# EAGLE board QTP-NEUTRIK D-hole (EAGLE 7.4.0)
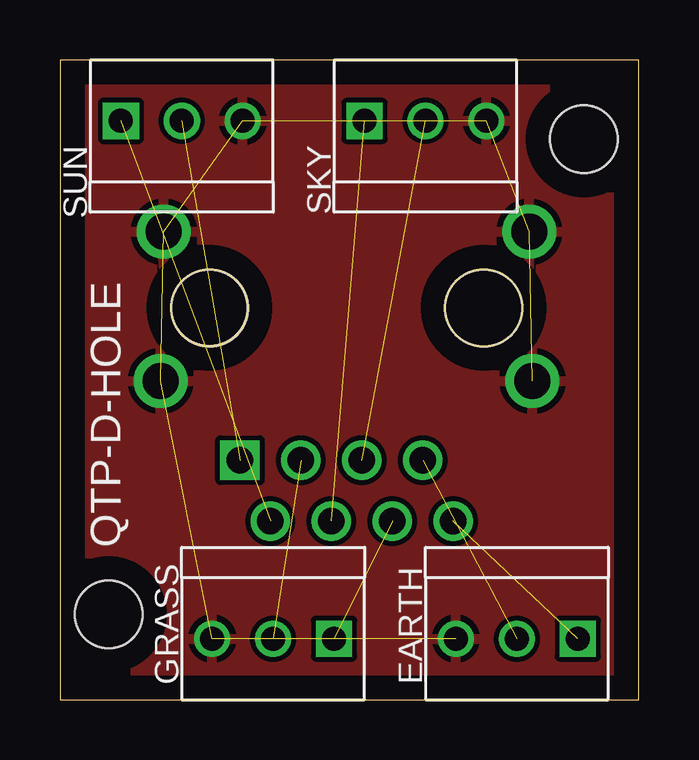
[diagram p0: board, top side]
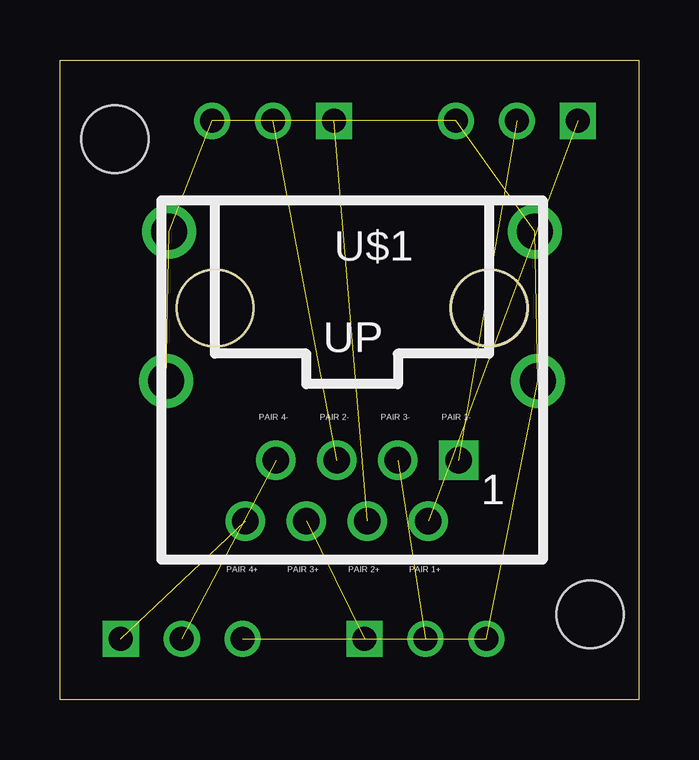
[diagram p1: board, bottom side, seen from below]

Size 24.13 x 26.67 mm. Coordinates in mm from the lower left corner, seen from the top.
Outline: 0,0 24.13,0 24.13,26.67 0,26.67 0,0
Copper layers (1*16): Top 0.035mm / dielectric 1.5mm / Bottom 0.035mm
Design rules "default": minimum track width 10mil, minimum drill 24mil, track to track 8mil, track to pad 8mil, pad to pad 8mil, via to via 8mil, smd to smd 8mil, copper to edge 40mil, drill to drill 8mil, minimum pad ring 10mil, minimum via ring 8mil, stop-mask expansion 4mil, vias tented up to drill 0mil, thermal gap 10mil
Holes 2.8 mm at 21.84,23.37 2.03,3.56
bRestrict: area 8.9,11.4 to 10.2,25.4

## Footprints (pad centres in the part's own frame; a part is rotated, then mirrored left to right if it is on the bottom)
CON-WBS-LOCKING-0.1-3 = drill 1 square: P$1 2.54,0 | drill 1: P$2 0,0; P$3 -2.54,0
ASSMAN-RJ45_VERT = drill 1.1 square: P$1 -4.432,10.846 | drill 1.1: P$2 -3.162,13.386; P$3 -1.892,10.846; P$4 -0.622,13.386; P$5 0.648,10.846; P$6 1.918,13.386; P$7 3.188,10.846; P$8 4.458,13.386 | drill 1.5: P$9 -7.607,1.321; P$10 7.633,1.321; P$11 -7.744,7.539; P$12 7.767,7.539 | hole 3.2: -5.702,4.496; 5.728,4.496 | hole 3.175: -5.702,4.496

## Placement (x,y rotation side)
EARTH  [CON-WBS-LOCKING-0.1-3]  19.05,2.54 0 top
GRASS  [CON-WBS-LOCKING-0.1-3]  8.89,2.54 0 top
SKY  [CON-WBS-LOCKING-0.1-3]  15.24,24.13 180 top
SUN  [CON-WBS-LOCKING-0.1-3]  5.08,24.13 180 top
U$1  CON-QTP_VERT  [ASSMAN-RJ45_VERT]  11.94,20.83 180 bottom

## Library data of the parts
EARTH GRASS SKY SUN U$1 = APK - PARTS

## Nets
GND: EARTH.P$3 GRASS.P$3 SKY.P$3 SUN.P$3 U$1.P$9 U$1.P$10 U$1.P$11 U$1.P$12
N$1: SUN.P$1 U$1.P$2
N$2: SUN.P$2 U$1.P$1
N$3: SKY.P$1 U$1.P$4
N$5: GRASS.P$1 U$1.P$6
N$6: GRASS.P$2 U$1.P$3
N$7: EARTH.P$1 U$1.P$8
N$8: EARTH.P$2 U$1.P$7
SUN_N: SKY.P$2 U$1.P$5

## Tracks (layer width: path | path; a pad name or v marks a point on that pad's centre or on a via)
GND  (7 unrouted)
  pour Top: -24.13,30.48 25.15,30.23 26.42,-2.54 -24.13,0.25
N$1  (1 unrouted)
N$2  (1 unrouted)
N$3  (1 unrouted)
N$5  (1 unrouted)
N$6  (1 unrouted)
N$7  (1 unrouted)
N$8  (1 unrouted)
SUN_N  (1 unrouted)

## Text on the board
tPlace: QTP-D-HOLE